# Altium PCB NB3000XN.PcbDoc (part 27 of 71)
Units mil, origin at the board's own origin, x right, y up, seen from the top; angles counter-clockwise.
Board outline 9527.56 x 6929.77 mil, 6 copper layers (Top Layer, GND+SHIELD, MidLayer1, MidLayer2, P2 - 3V3+5V0, Bottom Layer), stack 62.375 mil thick; 832 components, 1027 nets, 4655 pads, 4981 vias.
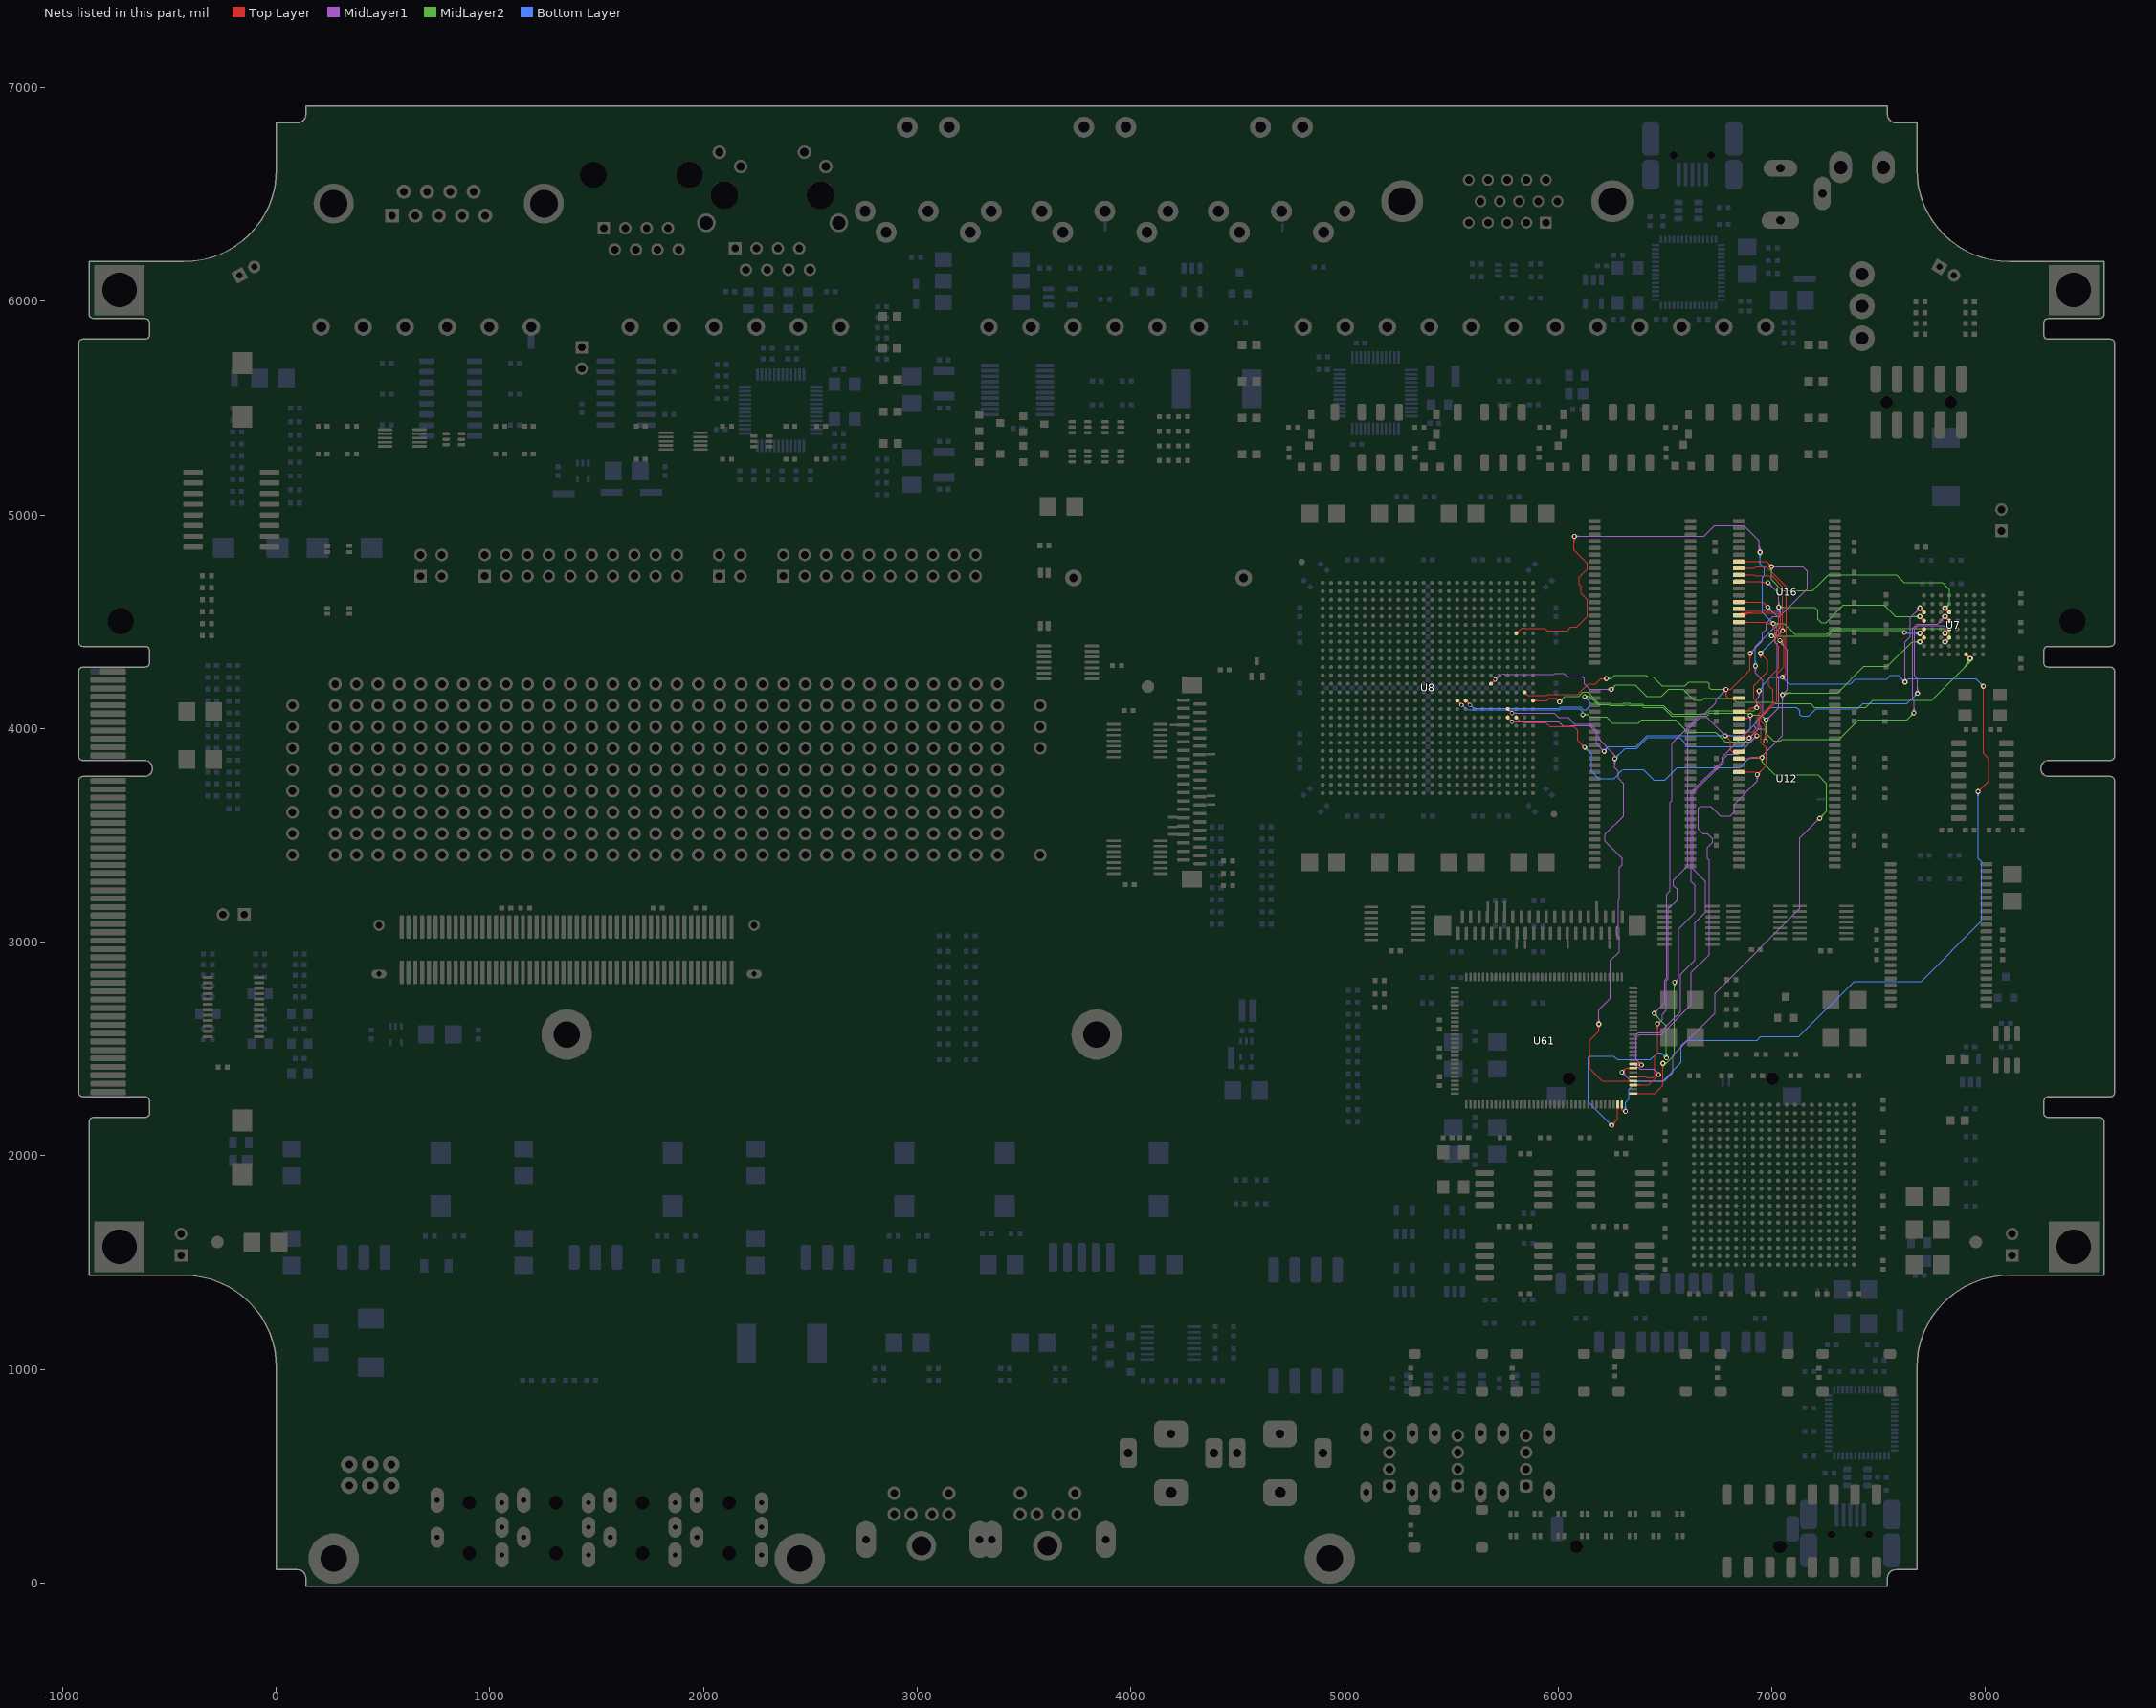
[diagram p31: the nets of this part, all layers, seen from the top]

## Via types
v1: diameter 23, hole 11.81, Top Layer to Bottom Layer, 3672 vias
v2: diameter 26, hole 11.81, Top Layer to Bottom Layer, 461 vias
v3: diameter 19, hole 11.81, Top Layer to Bottom Layer, tented both sides, 396 vias
v4: diameter 23.62, hole 11.81, Top Layer to Bottom Layer, 288 vias
v5: diameter 20, hole 11.81, Top Layer to Bottom Layer, 91 vias
v6: diameter 23, hole 11.81, Top Layer to Bottom Layer, tented both sides, 50 vias
v7: diameter 31, hole 11.81, Top Layer to Bottom Layer, 15 vias
v8: diameter 27.56, hole 11.81, Top Layer to Bottom Layer, tented both sides, 4 vias
v9: diameter 29, hole 11.81, Top Layer to Bottom Layer, 3 vias
v10: diameter 21, hole 11.81, Top Layer to Bottom Layer, 1 vias

## Nets (pads, with @x,y where several pads share a name; then routed paths per layer and width w, separated by ;. In a path a pad name is that pad's centre, name@x,y a point inside that pad or via, vN(x,y) a via of type N, cw(c..) or ccw(c..) an arc to the next point about the centre after c; other vN are vias at no path point) (continued)
DB_MEM.BUS_A24: U7.C8 U8.N21 | length 2990.7
  Top Layer w4: U8.N21@5685.28,4209.69 v3(5704.96,4229.37) ; U8.N21@5685.28,4217.03 ccw(c5685.28,4234.75) 5697.81,4222.22 ccw(c5710.34,4209.69) U8.N21@5692.62,4209.69 ; U8.N21@5685.28,4217.19 ccw(c5685.28,4235.29) 5698.08,4222.49 ccw(c5710.88,4209.69) U8.N21@5692.78,4209.69 ; 5692.16,4216.57 cw(c5704.96,4203.76) 5704.96,4221.87 ccw(c5704.96,4203.76) 5692.16,4216.57 ; 5692.16,4216.57 ccw(c5679.35,4229.37) 5697.46,4229.37 cw(c5679.35,4229.37) 5692.16,4216.57
  Top Layer w8: U7.C8@7909.06,4341.2 cw(c7909.06,4326.72) 7919.3,4336.96 cw(c7929.54,4347.2) U7.C8@7915.06,4347.2 ; U7.C8@7909.06,4347.2 v2(7928.74,4327.52) ; v2@7919.74,4327.52 ccw(c7898.01,4327.52) 7913.38,4342.88 ccw(c7928.74,4358.25) v2@7928.74,4336.52
  MidLayer1 w4: v3@5705.61,4236.84 ccw(c5707.19,4254.88) 5718.83,4241.01 ; v3@5712.43,4228.72 cw(c5730.47,4227.14) 5718.83,4241.01 ; 5781.77,4253.23 5767.84,4253.23 ; v1@6241.81,4176.66 ccw(c6225.59,4160.44) 6225.59,4183.37 ccw(c6225.59,4206.31) v1@6241.81,4190.09 ; v1@6244.64,4179.49 ccw(c6235.25,4170.1) 6235.25,4183.37 ccw(c6235.25,4196.65) v1@6244.64,4187.26 ; v1(6248.52,4183.37) 6148.52,4183.37 6123.52,4208.37 6123.52,4233.37 6115.19,4241.71 6044.19,4241.71 6027.52,4258.37 5985,4258.37 5979.86,4253.23 5920,4253.23 5910,4253.23 5861.38,4253.23 5841.96,4253.23 5767.84,4253.23 ; 5718.83,4241.01 cw(c5748.34,4211.5) 5748.34,4253.23 5767.84,4253.23
  MidLayer2 w4: v1(6248.52,4183.37) 6270.19,4205.04 6360.19,4205.04 6415.19,4150.04 6483.88,4150.04 6517.21,4183.37 6584.84,4183.37 6634.84,4133.37 6656.86,4133.37 6673.52,4133.37 6681.86,4141.71 6815.19,4141.71 6831.86,4125.04 7006.86,4125.04 7015.19,4116.71 7181.86,4116.71 7198.52,4100.04 7440.19,4100.04 7473.52,4133.37 7748.19,4133.37 7930.19,4315.37 7928.86,4316.71 7928.74,4316.71 v2(7928.74,4327.52) ; v1@6248.52,4188.87 ccw(c6248.52,4202.15) 6257.91,4192.76 ccw(c6267.3,4183.37) v1@6254.02,4183.37 ; v1@6248.52,4192.87 ccw(c6248.52,4215.81) 6264.74,4199.59 ccw(c6280.96,4183.37) v1@6258.02,4183.37 ; 7900.35,4285.53 ccw(c7858.36,4327.52) v2@7917.74,4327.52 ; 7907.18,4292.36 ccw(c7872.02,4327.52) v2@7921.74,4327.52 ; 7914.01,4299.19 ccw(c7885.68,4327.52) v2@7925.74,4327.52 ; 7920.83,4306.02 ccw(c7899.33,4327.52) v2@7929.74,4327.52 ; 7927.66,4312.85 ccw(c7912.99,4327.52) v2@7933.74,4327.52
DB_MEM.BUS_D0: U7.E3 U8.P25 U12.2 U16.7 U61.37 | length 7296.9
  Top Layer w4: U8.P25@5842.76,4162.97 cw(c5842.76,4145.25) 5855.29,4157.78 ; U8.P25@5850.1,4170.31 ccw(c5867.83,4170.31) 5855.29,4157.78 ; v1@6218.81,4226.66 ccw(c6202.59,4210.44) 6202.59,4233.37 ccw(c6202.59,4256.31) v1@6218.81,4240.09 ; v1@6221.64,4229.49 ccw(c6212.25,4220.1) 6212.25,4233.37 ccw(c6212.25,4246.65) v1@6221.64,4237.26 ; v1(6225.52,4233.37) 6198.52,4233.37 6173.52,4208.37 6141.52,4208.37 6092.52,4159.37 5953.04,4159.37 5948.47,4154.81 5920,4154.81 5910,4154.81 5862.47,4154.81 cw(c5862.47,4164.96) 5855.29,4157.78 ; v1(6250.52,2142.37) 6278.66,2170.51 U61.37@6278.66,2240 ; v1@6250.52,2147.87 ccw(c6250.52,2161.15) 6259.91,2151.76 ccw(c6269.3,2142.37) v1@6256.02,2142.37 ; v1@6250.52,2151.87 ccw(c6250.52,2174.81) 6266.74,2158.59 ccw(c6282.96,2142.37) v1@6260.02,2142.37 ; U61.37@6275.83,2223.98 cw(c6269,2217.15) 6278.66,2217.15 cw(c6288.32,2217.15) U61.37@6281.49,2223.98 ; v1@6778.47,4176.66 cw(c6762.26,4160.44) 6785.19,4160.44 cw(c6808.13,4160.44) v1@6791.91,4176.66 ; v1@6781.3,4179.49 cw(c6771.91,4170.1) 6785.19,4170.1 cw(c6798.47,4170.1) v1@6789.08,4179.49 ; v1@6789.11,4179.52 cw(c6798.31,4170.47) 6798.31,4183.37 cw(c6798.31,4196.28) v1@6789.11,4187.23 ; v1@6791.96,4176.71 cw(c6807.86,4161.09) 6807.86,4183.37 ; v1@6791.96,4190.04 ccw(c6807.86,4205.66) 6807.86,4183.37 ; U12.2@6822.37,4137.3 ccw(c6808.72,4123.64) 6808.72,4142.95 ccw(c6808.72,4162.27) U12.2@6822.37,4148.61 ; U12.2@6825.61,4142.95 U12.2@6845.59,4142.95 6796.05,4142.95 6785.19,4153.81 v1(6785.19,4183.37) 6807.86,4183.37 ; U16.7@6845.59,4781.73 6975.17,4781.73 v1(6998.52,4758.37) ; U16.7@6868.81,4776.08 cw(c6882.46,4762.42) 6882.46,4781.73 cw(c6882.46,4801.05) U16.7@6868.81,4787.39 ; v1@6891.81,4345.66 cw(c6875.59,4329.44) 6898.52,4329.44 cw(c6921.46,4329.44) v1@6905.24,4345.66 ; v1@6894.64,4348.49 cw(c6885.25,4339.1) 6898.52,4339.1 cw(c6911.8,4339.1) v1@6902.41,4348.49 ; v1(6898.52,4352.37) 6898.52,4274.04 6807.86,4183.37 ; v1@6989.02,4758.37 ccw(c6966.09,4758.37) 6982.31,4774.59 ccw(c6998.52,4790.81) v1@6998.52,4767.87 ; v1@6993.02,4758.37 ccw(c6979.75,4758.37) 6989.14,4767.76 ccw(c6998.52,4777.15) v1@6998.52,4763.87
  Top Layer w8: v2@7810.63,4554.74 cw(c7810.63,4533.01) 7825.99,4548.38 cw(c7841.36,4563.74) v2@7819.63,4563.74 ; v2(7810.63,4563.74) U7.E3@7830.32,4544.06 ; U7.E3@7824.32,4544.06 ccw(c7809.83,4544.06) 7820.07,4554.3 ccw(c7830.32,4564.54) U7.E3@7830.32,4550.06
  MidLayer1 w4: v1(6448.52,2666.71) 6498.52,2716.71 6498.52,2822.67 6507.19,2831.34 6507.19,3224.41 6523.52,3240.75 6523.52,3654.79 ; v1@6448.52,2672.21 ccw(c6448.52,2685.49) 6457.91,2676.1 ccw(c6467.3,2666.71) v1@6454.02,2666.71 ; v1@6448.52,2676.21 ccw(c6448.52,2699.14) 6464.74,2682.93 ccw(c6480.96,2666.71) v1@6458.02,2666.71 ; 6530,3661.26 6523.52,3654.79 ; v1@6775.69,4183.37 cw(c6752.76,4183.37) 6768.97,4167.16 cw(c6785.19,4150.94) v1@6785.19,4173.87 ; v1@6779.69,4183.37 cw(c6766.41,4183.37) 6775.8,4173.99 cw(c6785.19,4164.6) v1@6785.19,4177.87 ; v1(6785.19,4183.37) 6737.87,4136.06 6737.87,4122.72 6685.15,4070 6671.5,4070 6531.86,3930.36 6531.86,3663.12 6523.52,3654.79 ; v1(6898.52,4352.37) 6956.86,4410.71 6956.86,4448.37 6973.52,4465.04 6973.52,4492.71 7005.86,4525.04 7037.19,4525.04 7166.52,4654.37 7166.52,4735.37 7143.52,4758.37 v1(6998.52,4758.37) ; v1@6898.52,4357.87 ccw(c6898.52,4371.15) 6907.91,4361.76 ccw(c6917.3,4352.37) v1@6904.02,4352.37 ; v1@6898.52,4361.87 ccw(c6898.52,4384.81) 6914.74,4368.59 ccw(c6930.96,4352.37) v1@6908.02,4352.37 ; v1@7002.41,4754.49 cw(c7011.8,4745.1) 7011.8,4758.37 cw(c7011.8,4771.65) v1@7002.41,4762.26 ; v1@7005.24,4751.66 cw(c7021.46,4735.44) 7021.46,4758.37 cw(c7021.46,4781.31) v1@7005.24,4765.09
  MidLayer2 w4: v1(6225.52,4233.37) 6248.52,4233.37 6265.19,4250.04 6411.6,4250.04 6419.94,4241.71 6444.19,4241.71 6486.52,4199.37 6593.5,4199.37 6612.17,4218.04 6698.52,4218.04 6706.86,4209.71 6706.86,4191.71 6715.19,4183.37 v1(6785.19,4183.37) ; v1@6229.41,4229.49 cw(c6238.8,4220.1) 6238.8,4233.37 cw(c6238.8,4246.65) v1@6229.41,4237.26 ; v1@6232.24,4226.66 cw(c6248.46,4210.44) 6248.46,4233.37 cw(c6248.46,4256.31) v1@6232.24,4240.09 ; v1@6448.52,2657.21 cw(c6448.52,2634.27) 6464.74,2650.49 cw(c6480.96,2666.71) v1@6458.02,2666.71 ; v1@6448.52,2661.21 cw(c6448.52,2647.93) 6457.91,2657.32 cw(c6467.3,2666.71) v1@6454.02,2666.71 ; v1(6448.52,2666.71) 6506.86,2608.37 v1(6506.86,2458.37) ; v1@6500.14,2465.09 ccw(c6483.92,2481.31) 6506.86,2481.31 ccw(c6529.79,2481.31) v1@6513.57,2465.09 ; v1@6502.97,2462.26 ccw(c6493.58,2471.65) 6506.86,2471.65 ccw(c6520.14,2471.65) v1@6510.75,2462.26 ; v1@6778.47,4176.66 ccw(c6762.26,4160.44) 6762.26,4183.37 ccw(c6762.26,4206.31) v1@6778.47,4190.09 ; v1@6781.3,4179.49 ccw(c6771.91,4170.1) 6771.91,4183.37 ccw(c6771.91,4196.65) v1@6781.3,4187.26 ; v1@6991.81,4751.66 cw(c6975.59,4735.44) 6998.52,4735.44 cw(c7021.46,4735.44) v1@7005.24,4751.66 ; v1@6994.64,4754.49 cw(c6985.25,4745.1) 6998.52,4745.1 cw(c7011.8,4745.1) v1@7002.41,4754.49 ; v1(6998.52,4758.37) 6998.52,4696.48 7048.96,4646.04 7191.04,4646.04 7265,4720 7582.54,4720 7619.17,4683.37 7798.52,4683.37 7831.86,4650.04 7831.86,4584.97 7818.27,4571.37 7810.63,4571.37 v2(7810.63,4563.74) ; v2@7810.63,4570.74 ccw(c7810.63,4587.64) 7822.58,4575.69 ccw(c7834.53,4563.74) v2@7817.63,4563.74 ; v2@7810.63,4574.74 ccw(c7810.63,4601.3) 7829.41,4582.52 ccw(c7848.19,4563.74) v2@7821.63,4563.74
  Bottom Layer w4: v1@6241.02,2142.37 ccw(c6218.09,2142.37) 6234.31,2158.59 ccw(c6250.52,2174.81) v1@6250.52,2151.87 ; v1@6245.02,2142.37 ccw(c6231.75,2142.37) 6241.14,2151.76 ccw(c6250.52,2161.15) v1@6250.52,2147.87 ; v1(6250.52,2142.37) 6140.19,2252.71 6140.19,2395 6140.19,2400.04 6140.19,2460.19 6146.71,2466.71 6206.86,2466.71 6260.54,2466.71 6277.21,2450.04 6431.86,2450.04 6465.19,2483.37 6481.86,2483.37 v1(6506.86,2458.37) ; v1@6497.36,2458.37 ccw(c6474.42,2458.37) 6490.64,2474.59 ccw(c6506.86,2490.81) v1@6506.86,2467.87 ; v1@6501.36,2458.37 ccw(c6488.08,2458.37) 6497.47,2467.76 ccw(c6506.86,2477.15) v1@6506.86,2463.87
DB_MEM.BUS_D1: U7.H3 U8.R26 U12.4 U16.8 U61.38 | length 7924
  Top Layer w4: U8.R26@5882.13,4130.94 5910,4130.94 5920,4130.94 5947.24,4130.94 5958,4141.71 5990.19,4141.71 v1(6006.86,4125.04) ; U8.R26@5887.32,4125.75 cw(c5899.85,4113.22) 5899.85,4130.94 cw(c5899.85,4148.67) U8.R26@5887.32,4136.14 ; U8.R26@5887.43,4125.64 cw(c5900.23,4112.84) 5900.23,4130.94 cw(c5900.23,4149.05) U8.R26@5887.43,4136.25 ; v1@5997.36,4125.04 ccw(c5974.42,4125.04) 5990.64,4141.26 ccw(c6006.86,4157.48) v1@6006.86,4134.54 ; v1@6001.36,4125.04 ccw(c5988.08,4125.04) 5997.47,4134.43 ccw(c6006.86,4143.82) v1@6006.86,4130.54 ; U61.38@6295.52,2223.98 cw(c6288.69,2217.15) 6298.35,2217.15 cw(c6308,2217.15) U61.38@6301.17,2223.98 ; U61.38@6298.34,2240 6298.35,2216.37 6306.35,2208.37 v1(6315.19,2208.37) ; U12.4@6845.59,4079.96 6882.6,4079.96 6900.02,4097.37 v1(6929.52,4097.37) ; U16.8@6845.59,4750.24 6918.39,4750.24 6926.52,4758.37 6973.52,4758.37 7068.86,4663.04 7068.86,4433.37 7065.19,4429.71 7065.19,4257.37 v1(7048.52,4240.71) ; U12.4@6868.81,4074.3 cw(c6882.46,4060.65) 6882.46,4079.96 cw(c6882.46,4099.27) U12.4@6868.81,4085.62 ; U16.8@6868.81,4744.58 cw(c6882.46,4730.92) 6882.46,4750.24 cw(c6882.46,4769.55) U16.8@6868.81,4755.89 ; v1@6922.81,4090.66 ccw(c6906.59,4074.44) 6906.59,4097.37 ccw(c6906.59,4120.31) v1@6922.81,4104.09 ; v1@6925.64,4093.49 ccw(c6916.25,4084.1) 6916.25,4097.37 ccw(c6916.25,4110.65) v1@6925.64,4101.26 ; v1@7048.52,4246.21 ccw(c7048.52,4259.49) 7057.91,4250.1 ccw(c7067.3,4240.71) v1@7054.02,4240.71 ; v1@7048.52,4250.21 ccw(c7048.52,4273.14) 7064.74,4256.93 ccw(c7080.96,4240.71) v1@7058.02,4240.71 ; v1(7965.19,3705.37) 8015.19,3755.37 8015.19,3858.37 7990.19,3883.37 v1(7990.19,4198.04) ; v1@7965.19,3710.87 ccw(c7965.19,3724.15) 7974.58,3714.76 ccw(c7983.97,3705.37) v1@7970.69,3705.37 ; v1@7965.19,3714.87 ccw(c7965.19,3737.81) 7981.41,3721.59 ccw(c7997.63,3705.37) v1@7974.69,3705.37
  Top Layer w8: v2@7692.52,4554.74 cw(c7692.52,4533.01) 7707.88,4548.38 cw(c7723.25,4563.74) v2@7701.52,4563.74 ; v2(7692.52,4563.74) U7.H3@7712.2,4544.06 ; U7.H3@7706.2,4544.06 ccw(c7691.72,4544.06) 7701.96,4554.3 ccw(c7712.2,4564.54) U7.H3@7712.2,4550.06
  MidLayer1 w4: v1@6922.81,4104.09 ccw(c6906.59,4120.31) 6929.52,4120.31 ccw(c6952.46,4120.31) v1@6936.24,4104.09 ; v1@6925.64,4101.26 ccw(c6916.25,4110.65) 6929.52,4110.65 ccw(c6942.8,4110.65) v1@6933.41,4101.26 ; v1(6929.52,4097.37) 6929.52,4139.52 6940,4150 ; v1@6933.47,4169.99 cw(c6917.26,4153.77) 6940.19,4153.77 cw(c6963.13,4153.77) v1@6946.91,4169.99 ; v1@6936.3,4172.82 cw(c6926.91,4163.43) 6940.19,4163.43 cw(c6953.47,4163.43) v1@6944.08,4172.82 ; 6940.19,4150 v1(6940.19,4176.71) ; v1@7616.81,4224.43 ccw(c7600.59,4240.64) 7623.52,4240.64 ccw(c7646.46,4240.64) v1@7630.24,4224.43 ; v1@7619.64,4221.6 ccw(c7610.25,4230.99) 7623.52,4230.99 ccw(c7636.8,4230.99) v1@7627.41,4221.6 ; v1(7623.52,4217.71) 7623.52,4405.39 7648.52,4430.39 7648.52,4519.74 v2(7692.52,4563.74) ; v2@7681.52,4563.74 cw(c7654.96,4563.74) 7673.74,4544.96 cw(c7692.52,4526.19) v2@7692.52,4552.74 ; v2@7685.52,4563.74 cw(c7668.62,4563.74) 7680.57,4551.79 cw(c7692.52,4539.84) v2@7692.52,4556.74
  MidLayer2 w4: v1(6006.86,4125.04) 6031.86,4150.04 6095.52,4150.04 6115.48,4170 6138.23,4170 6188.52,4119.71 6241.48,4119.71 6245.82,4115.37 6302.56,4115.37 6306,4118.81 6334,4118.81 6337.44,4115.37 6394.5,4115.37 6401.5,4108.38 6493.16,4108.38 6534.17,4067.37 6692.86,4067.37 6708.86,4083.37 6915.52,4083.37 v1(6929.52,4097.37) ; v1@6006.86,4130.54 ccw(c6006.86,4143.82) 6016.25,4134.43 ccw(c6025.64,4125.04) v1@6012.36,4125.04 ; v1@6006.86,4134.54 ccw(c6006.86,4157.48) 6023.07,4141.26 ccw(c6039.29,4125.04) v1@6016.36,4125.04
  Bottom Layer w4: v1@6308.47,2215.09 ccw(c6292.26,2231.31) 6315.19,2231.31 ccw(c6338.13,2231.31) v1@6321.91,2215.09 ; v1@6311.3,2212.26 ccw(c6301.91,2221.65) 6315.19,2221.65 ccw(c6328.47,2221.65) v1@6319.08,2212.26 ; v1(6315.19,2208.37) 6315.19,2250 6332.19,2267 6332.19,2312.19 6370.04,2350.04 6489.58,2350.04 6576.18,2436.64 6576.18,2516.38 6601.51,2541.71 6930.52,2541.71 6947.19,2558.37 7126.86,2558.37 7385.19,2816.71 7698.52,2816.71 7981.86,3100.04 7981.86,3376.04 7965.19,3392.71 v1(7965.19,3705.37) ; v1(6940.19,4176.71) 6955.75,4192.27 6955.75,4202.62 6993.84,4240.71 v1(7048.52,4240.71) 7080.86,4208.37 7367.54,4208.37 7391.54,4232.37 7537.33,4232.37 7555,4250.04 7591.19,4250.04 v1(7623.52,4217.71) 7639.19,4233.37 7954.86,4233.37 v1(7990.19,4198.04) ; v1@7041.81,4233.99 ccw(c7025.59,4217.77) 7025.59,4240.71 ccw(c7025.59,4263.64) v1@7041.81,4247.43 ; v1@7044.64,4236.82 ccw(c7035.25,4227.43) 7035.25,4240.71 ccw(c7035.25,4253.99) v1@7044.64,4244.6 ; v1@7048.52,4231.21 cw(c7048.52,4208.27) 7064.74,4224.49 cw(c7080.96,4240.71) v1@7058.02,4240.71 ; v1@7048.52,4235.21 cw(c7048.52,4221.93) 7057.91,4231.32 cw(c7067.3,4240.71) v1@7054.02,4240.71 ; v1@7614.02,4217.71 ccw(c7591.09,4217.71) 7607.31,4233.93 ccw(c7623.52,4250.14) v1@7623.52,4227.21 ; v1@7618.02,4217.71 ccw(c7604.75,4217.71) 7614.13,4227.1 ccw(c7623.52,4236.49) v1@7623.52,4223.21 ; v1@7958.47,3698.66 cw(c7942.26,3682.44) 7965.19,3682.44 cw(c7988.13,3682.44) v1@7971.91,3698.66 ; v1@7961.3,3701.49 cw(c7951.91,3692.1) 7965.19,3692.1 cw(c7978.47,3692.1) v1@7969.08,3701.49 ; v1@7980.69,4198.04 ccw(c7957.76,4198.04) 7973.97,4214.26 ccw(c7990.19,4230.48) v1@7990.19,4207.54 ; v1@7984.69,4198.04 ccw(c7971.41,4198.04) 7980.8,4207.43 ccw(c7990.19,4216.82) v1@7990.19,4203.54
DB_MEM.BUS_D2: U7.E4 U8.R18 U12.5 U16.9 U61.39 | length 7174.9
  Top Layer w4: U8.R18@5567.17,4123.44 cw(c5567.17,4105.34) 5579.97,4118.14 cw(c5592.77,4130.94) U8.R18@5574.67,4130.94 ; U8.R18@5567.17,4123.6 cw(c5567.17,4105.88) 5579.7,4118.41 cw(c5592.23,4130.94) U8.R18@5574.51,4130.94 ; U8.R18@5567.17,4130.94 v3(5586.85,4111.26) ; U61.39@6351.93,2291.98 6451.19,2291.98 6490.19,2330.98 v1(6490.19,2433.37) ; U61.39@6367.95,2289.15 cw(c6374.78,2282.32) 6374.78,2291.98 cw(c6374.78,2301.63) U61.39@6367.95,2294.8 ; v1@6483.47,2426.66 cw(c6467.26,2410.44) 6490.19,2410.44 cw(c6513.13,2410.44) v1@6496.91,2426.66 ; v1@6486.3,2429.49 cw(c6476.91,2420.1) 6490.19,2420.1 cw(c6503.47,2420.1) v1@6494.08,2429.49 ; U12.5@6845.59,4048.46 6885.28,4048.46 v1(6899.19,4062.37) ; U16.9@6845.59,4718.74 6915.52,4718.74 6919.52,4714.74 7000.49,4714.74 7050.86,4664.37 v1(7050.86,4458.37) ; U12.5@6868.81,4042.81 cw(c6882.46,4029.15) 6882.46,4048.46 cw(c6882.47,4067.78) U12.5@6868.81,4054.12 ; U16.9@6868.81,4713.08 cw(c6882.46,4699.43) 6882.46,4718.74 cw(c6882.46,4738.05) U16.9@6868.81,4724.4 ; v1@7044.14,4465.09 ccw(c7027.92,4481.31) 7050.86,4481.31 ccw(c7073.79,4481.31) v1@7057.57,4465.09 ; v1@7046.97,4462.26 ccw(c7037.58,4471.65) 7050.86,4471.65 ccw(c7064.14,4471.65) v1@7054.75,4462.26 ; 5574.05,4124.06 cw(c5561.24,4111.26) 5579.35,4111.26 ccw(c5561.24,4111.26) 5574.05,4124.06 ; 5574.05,4124.06 ccw(c5586.85,4136.87) 5586.85,4118.76 cw(c5586.85,4136.87) 5574.05,4124.06
  Top Layer w8: v2@7810.63,4515.37 cw(c7810.63,4493.64) 7825.99,4509.01 cw(c7841.36,4524.37) v2@7819.63,4524.37 ; v2(7810.63,4524.37) U7.E4@7830.32,4504.69 ; U7.E4@7824.32,4504.69 ccw(c7809.83,4504.69) 7820.07,4514.93 ccw(c7830.32,4525.17) U7.E4@7830.32,4510.69
  MidLayer1 w4: v1(6544.86,2813.04) 6561.71,2829.89 6564.86,2833.04 6564.86,3063 6640.19,3138.33 6640.19,3266.71 6623.52,3283.37 6623.52,3702.67 6767,3846.15 6767,3867 6899.19,3999.19 v1(6899.19,4062.37) ; v1@6544.86,2818.54 ccw(c6544.86,2831.82) 6554.25,2822.43 ccw(c6563.64,2813.04) v1@6550.36,2813.04 ; v1@6544.86,2822.54 ccw(c6544.86,2845.48) 6561.07,2829.26 ccw(c6577.29,2813.04) v1@6554.36,2813.04 ; v1@6892.47,4055.66 cw(c6876.26,4039.44) 6899.19,4039.44 cw(c6922.13,4039.44) v1@6905.91,4055.66 ; v1@6895.3,4058.49 cw(c6885.91,4049.1) 6899.19,4049.1 cw(c6912.47,4049.1) v1@6903.08,4058.49 ; v1(6973.52,4039.71) 7031.86,4098.04 7031.86,4233.37 7025.19,4240.04 7025.19,4396.04 7015.19,4406.04 7015.19,4422.71 v1(7050.86,4458.37) ; v1@6973.52,4045.21 ccw(c6973.52,4058.49) 6982.91,4049.1 ccw(c6992.3,4039.71) v1@6979.02,4039.71 ; v1@6973.52,4049.21 ccw(c6973.52,4072.14) 6989.74,4055.93 ccw(c7005.96,4039.71) v1@6983.02,4039.71 ; v1@7041.36,4458.37 cw(c7018.42,4458.37) 7034.64,4442.16 cw(c7050.86,4425.94) v1@7050.86,4448.87 ; v1@7045.36,4458.37 cw(c7032.08,4458.37) 7041.47,4448.99 cw(c7050.86,4439.6) v1@7050.86,4452.87 ; v1@7658.47,4080.09 ccw(c7642.26,4096.31) 7665.19,4096.31 ccw(c7688.13,4096.31) v1@7671.91,4080.09 ; v1@7661.3,4077.26 ccw(c7651.91,4086.65) 7665.19,4086.65 ccw(c7678.47,4086.65) v1@7669.08,4077.26 ; v1(7665.19,4073.37) 7665.19,4129.81 7660,4135 7660,4469.85 7679.97,4489.82 7776.08,4489.82 v2(7810.63,4524.37) ; v2@7799.63,4524.37 cw(c7773.07,4524.37) 7791.85,4505.59 cw(c7810.63,4486.82) v2@7810.63,4513.37 ; v2@7803.63,4524.37 cw(c7786.73,4524.37) 7798.68,4512.42 cw(c7810.63,4500.47) v2@7810.63,4517.37
  MidLayer2 w4: v1(6123.52,4150.04) 6146.88,4150.04 6185.21,4111.71 6238.17,4111.71 6242.5,4107.37 6305.87,4107.37 6309.31,4110.81 6330.69,4110.81 6334.13,4107.37 6391.19,4107.37 6398.18,4100.38 6489.85,4100.38 6530.86,4059.37 6697.19,4059.37 6709.86,4072.04 6889.52,4072.04 v1(6899.19,4062.37) 6950.86,4062.37 v1(6973.52,4039.71) 6973.52,3975.04 7006.86,3941.71 7040.19,3941.71 7048.52,3950.04 7314.58,3950.04 7405.92,4041.37 7633.19,4041.37 7641.86,4050.04 v1(7665.19,4073.37) ; v1@6127.41,4146.15 cw(c6136.8,4136.76) 6136.8,4150.04 cw(c6136.8,4163.32) v1@6127.41,4153.93 ; v1@6130.24,4143.32 cw(c6146.46,4127.11) 6146.46,4150.04 cw(c6146.46,4172.98) v1@6130.24,4156.76 ; v1(6490.19,2433.37) 6506.86,2433.37 ; v1@6498.36,2428.53 cw(c6506.86,2423.51) 6506.86,2433.37 ; v1@6498.36,2438.22 ccw(c6506.86,2443.24) 6506.86,2433.37 ; v1@6538.14,2806.32 cw(c6521.92,2790.11) 6544.86,2790.11 cw(c6567.79,2790.11) v1@6551.57,2806.32 ; v1@6540.97,2809.15 cw(c6531.58,2799.76) 6544.86,2799.76 cw(c6558.14,2799.76) v1@6548.75,2809.15 ; v1(6544.86,2813.04) 6544.86,2471.37 6506.86,2433.37 ; v1@6903.08,4058.49 cw(c6912.47,4049.1) 6912.47,4062.37 cw(c6912.47,4075.65) v1@6903.08,4066.26 ; v1@6905.91,4055.66 cw(c6922.13,4039.44) 6922.13,4062.37 cw(c6922.13,4085.31) v1@6905.91,4069.09 ; v1@6964.02,4039.71 ccw(c6941.09,4039.71) 6957.31,4055.93 ccw(c6973.52,4072.14) v1@6973.52,4049.21 ; v1@6966.81,4032.99 cw(c6950.59,4016.77) 6973.52,4016.77 cw(c6996.46,4016.77) v1@6980.24,4032.99 ; v1@6968.02,4039.71 ccw(c6954.75,4039.71) 6964.14,4049.1 ccw(c6973.52,4058.49) v1@6973.52,4045.21 ; v1@6969.64,4035.82 cw(c6960.25,4026.43) 6973.52,4026.43 cw(c6986.8,4026.43) v1@6977.41,4035.82 ; v1@7655.69,4073.37 cw(c7632.76,4073.37) 7648.97,4057.16 cw(c7665.19,4040.94) v1@7665.19,4063.87 ; v1@7659.69,4073.37 cw(c7646.41,4073.37) 7655.8,4063.99 cw(c7665.19,4054.6) v1@7665.19,4067.87
  Bottom Layer w4: v3@5587.5,4103.79 cw(c5589.08,4085.75) 5600.72,4099.62 cw(c5612.36,4113.49) v3@5594.32,4111.91 ; 5600.43,4099.87 ccw(c5610.36,4109.8) 5610.36,4095.75 5703.9,4095.75 5910,4095.75 5920,4095.75 6005.15,4095.75 6010.21,4100.81 6105.09,4100.81 6116.87,4089.02 6131.84,4089.02 6133.58,4090.77 6148.52,4105.71 6148.52,4125.04 v1(6123.52,4150.04) ; v1@6123.52,4140.54 cw(c6123.52,4117.61) 6139.74,4133.82 cw(c6155.96,4150.04) v1@6133.02,4150.04 ; v1@6123.52,4144.54 cw(c6123.52,4131.26) 6132.91,4140.65 cw(c6142.3,4150.04) v1@6129.02,4150.04
DB_MEM.BUS_D3: U7.H4 U8.R17 U12.7 U16.10 U61.41 | length 6741.8
  Top Layer w4: U8.R17@5527.8,4123.44 cw(c5527.8,4105.34) 5540.6,4118.14 cw(c5553.4,4130.94) U8.R17@5535.3,4130.94 ; U8.R17@5527.8,4123.6 cw(c5527.8,4105.88) 5540.33,4118.41 cw(c5552.86,4130.94) U8.R17@5535.14,4130.94 ; U8.R17@5527.8,4130.94 v3(5547.48,4111.26) ; U61.41@6356.86,2333.37 6423.52,2333.37 v1(6470.52,2380.37) ; U61.41@6367.95,2328.52 cw(c6379.68,2316.79) 6379.68,2333.37 ; v1@6461.02,2380.37 cw(c6438.09,2380.37) 6454.31,2364.16 cw(c6470.52,2347.94) v1@6470.52,2370.87 ; v1@6465.02,2380.37 cw(c6451.75,2380.37) 6461.14,2370.99 cw(c6470.52,2361.6) v1@6470.52,2374.87 ; U12.7@6845.59,3985.47 6911.52,3985.47 ; U16.10@6845.59,4687.24 6946.66,4687.24 6950.52,4683.37 v1(6981.86,4683.37) ; U12.7@6868.81,3979.82 cw(c6882.46,3966.16) 6882.46,3985.47 cw(c6882.46,4004.79) U12.7@6868.81,3991.13 ; U16.10@6868.81,4681.59 cw(c6882.46,4667.93) 6882.46,4687.24 cw(c6882.46,4706.56) U16.10@6868.81,4692.9 ; 6913.9,3983.09 cw(c6897.52,3966.71) v1@6920.69,3966.71 ; 6914.14,3982.86 ccw(c6930.19,3998.91) v1@6930.19,3976.21 ; v1@6930.19,3966.8 6911.52,3985.47 ; v1@6947.19,4342.87 cw(c6947.19,4319.94) 6963.41,4336.16 cw(c6979.63,4352.37) v1@6956.69,4352.37 ; v1@6947.19,4346.87 cw(c6947.19,4333.6) 6956.58,4342.99 cw(c6965.97,4352.37) v1@6952.69,4352.37 ; v1(6947.19,4352.37) 6981.86,4317.71 6981.86,4266.71 6915.19,4200.04 6915.19,4140.71 6948.52,4107.37 6948.52,4079.71 6931.86,4063.04 6931.86,4005.8 6911.52,3985.47 ; v1@6975.14,4676.66 ccw(c6958.92,4660.44) 6958.92,4683.37 ccw(c6958.92,4706.31) v1@6975.14,4690.09 ; v1@6977.97,4679.49 ccw(c6968.58,4670.1) 6968.58,4683.37 ccw(c6968.58,4696.65) v1@6977.97,4687.26 ; 5534.68,4124.06 cw(c5521.87,4111.26) 5539.98,4111.26 ccw(c5521.87,4111.26) 5534.68,4124.06 ; 5534.68,4124.06 ccw(c5547.48,4136.87) 5547.48,4118.76 cw(c5547.48,4136.87) 5534.68,4124.06 ; 6920.73,3976.26 cw(c6911.18,3966.71) 6924.69,3966.71 ccw(c6911.18,3966.71) 6920.73,3976.26 ; 6920.97,3976.03 ccw(c6930.19,3985.25) 6930.19,3972.21 cw(c6930.19,3985.25) 6920.97,3976.03
  Top Layer w8: v2@7692.52,4515.37 cw(c7692.52,4493.64) 7707.88,4509.01 cw(c7723.25,4524.37) v2@7701.52,4524.37 ; v2(7692.52,4524.37) U7.H4@7712.2,4504.69 ; U7.H4@7706.2,4504.69 ccw(c7691.72,4504.69) 7701.96,4514.93 ccw(c7712.2,4525.17) U7.H4@7712.2,4510.69
  MidLayer1 w4: 6451.01,2404.56 cw(c6426.82,2380.37) v1@6461.02,2380.37 ; 6457.84,2397.73 cw(c6440.48,2380.37) v1@6465.02,2380.37 ; 6462.27,2393.29 ccw(c6470.52,2401.55) v1@6470.52,2389.87 ; 6464.66,2390.9 cw(c6454.14,2380.37) v1@6469.02,2380.37 ; v1@6470.52,2385.04 6448.52,2407.04 6381.86,2407.04 6356.86,2432.04 6356.86,2557.56 6375,2575.71 6474.19,2575.71 6573.52,2675.04 6573.52,2850.04 6640.19,2916.71 6640.19,3091.71 6690.19,3141.71 6690.19,3283.37 6631.86,3341.71 6631.86,3699.69 6775,3842.83 6775,3860 6795,3880 6843.48,3880 v1(6930.19,3966.71) ; v1@6920.69,3966.71 cw(c6897.76,3966.71) 6913.97,3950.49 cw(c6930.19,3934.27) v1@6930.19,3957.21 ; v1@6924.69,3966.71 cw(c6911.41,3966.71) 6920.8,3957.32 cw(c6930.19,3947.93) v1@6930.19,3961.21 ; v1@6941.14,4345.05 cw(c6930.5,4332.19) 6947.19,4332.19 cw(c6963.88,4332.19) v1@6953.24,4345.05 ; v1@6943.69,4348.14 cw(c6937.53,4340.69) 6947.19,4340.69 cw(c6956.85,4340.69) v1@6950.7,4348.14 ; v1@6981.86,4673.87 cw(c6981.86,4650.94) 6998.07,4667.16 cw(c7014.29,4683.37) v1@6991.36,4683.37 ; v1@6981.86,4677.87 cw(c6981.86,4664.6) 6991.25,4673.99 cw(c7000.64,4683.37) v1@6987.36,4683.37 ; v1(6981.86,4683.37) 7032.52,4632.71 v1(7032.52,4568.37) ; v1@7025.81,4575.09 ccw(c7009.59,4591.31) 7032.52,4591.31 ccw(c7055.46,4591.31) v1@7039.24,4575.09 ; v1@7028.64,4572.26 ccw(c7019.25,4581.65) 7032.52,4581.65 ccw(c7045.8,4581.65) v1@7036.41,4572.26
  MidLayer2 w4: v1(6115,4065) 6138.37,4065 6148.37,4055 6225.23,4055 6253.85,4026.37 6375.88,4026.37 6390.88,4041.37 6510,4041.37 6518.63,4041.37 6548.63,4041.37 6565,4025 6606.96,3983.04 6736.96,3983.04 6782,3938 6901.48,3938 v1(6930.19,3966.71) ; v1@6118.89,4061.11 cw(c6128.28,4051.72) 6128.28,4065 cw(c6128.28,4078.28) v1@6118.89,4068.89 ; v1@6121.72,4058.28 cw(c6137.93,4042.06) 6137.93,4065 cw(c6137.93,4087.93) v1@6121.72,4071.72 ; v1@6920.69,3966.71 cw(c6897.76,3966.71) 6913.97,3950.49 cw(c6930.19,3934.27) v1@6930.19,3957.21 ; v1@6924.69,3966.71 cw(c6911.41,3966.71) 6920.8,3957.32 cw(c6930.19,3947.93) v1@6930.19,3961.21 ; v1(7032.52,4568.37) 7199.86,4568.37 7215.19,4553.04 7215.19,4512.04 7231.86,4495.37 7253.19,4495.37 7335.52,4577.71 7524.61,4577.71 7577.94,4524.37 v2(7692.52,4524.37) ; v1@7036.41,4564.49 cw(c7045.8,4555.1) 7045.8,4568.37 cw(c7045.8,4581.65) v1@7036.41,4572.26 ; v1@7039.24,4561.66 cw(c7055.46,4545.44) 7055.46,4568.37 cw(c7055.46,4591.31) v1@7039.24,4575.09 ; v2@7684.74,4516.59 ccw(c7665.96,4497.82) 7665.96,4524.37 ccw(c7665.96,4550.93) v2@7684.74,4532.15 ; v2@7687.57,4519.42 ccw(c7675.62,4507.47) 7675.62,4524.37 ccw(c7675.62,4541.27) v2@7687.57,4529.32
  Bottom Layer w4: v3@5548.13,4103.79 cw(c5549.71,4085.75) 5561.35,4099.62 ; v3@5554.95,4111.91 ccw(c5572.99,4113.49) 5561.35,4099.62 ; v1(6115,4065) 6115,4079.59 6101.77,4092.81 6013.53,4092.81 6008.11,4087.4 5924.74,4087.4 5920,4087.4 5910,4087.4 5703.9,4087.4 5684.48,4087.4 5610.36,4087.4 5590.86,4087.4 cw(c5590.86,4129.13) 5561.35,4099.62 ; v1(6947.19,4352.37) 7016.19,4421.37 7016.19,4451.04 7040.19,4475.04 7040.19,4560.71 v1(7032.52,4568.37) ; v1@6947.19,4357.87 ccw(c6947.19,4371.15) 6956.58,4361.76 ccw(c6965.97,4352.37) v1@6952.69,4352.37 ; v1@6947.19,4361.87 ccw(c6947.19,4384.81) 6963.41,4368.59 ccw(c6979.63,4352.37) v1@6956.69,4352.37 ; v1@7025.81,4561.66 cw(c6991.08,4526.93) 7040.19,4526.93 ; v1@7028.64,4564.49 cw(c7000.74,4536.59) 7040.19,4536.59 ; v1@7031.46,4567.31 cw(c7010.4,4546.25) 7040.19,4546.25 ; v1@7034.29,4570.14 cw(c7020.05,4555.9) 7040.19,4555.9
DB_MEM.BUS_D4: U7.H5 U8.T23 U12.8 U16.13 U61.42 | length 6009.3
  Top Layer w4: U8.T23@5764.02,4084.07 cw(c5764.02,4065.97) 5776.82,4078.77 cw(c5789.62,4091.57) U8.T23@5771.52,4091.57 ; U8.T23@5764.02,4084.23 cw(c5764.02,4066.51) 5776.55,4079.04 cw(c5789.08,4091.57) U8.T23@5771.36,4091.57 ; U8.T23@5764.02,4091.57 v3(5783.7,4071.89) ; v1@6183.47,2609.99 cw(c6167.26,2593.77) 6190.19,2593.77 cw(c6213.13,2593.77) v1@6196.91,2609.99 ; v1@6186.3,2612.82 cw(c6176.91,2603.43) 6190.19,2603.43 cw(c6203.47,2603.43) v1@6194.08,2612.82 ; v1(6190.19,2616.71) 6190.19,2583.37 6148.52,2541.71 6148.52,2408.37 6205.87,2351.03 U61.42@6351.49,2351.03 ; U61.42@6335.91,2348.2 ccw(c6329.08,2341.37) 6329.08,2351.03 ccw(c6329.08,2360.69) U61.42@6335.91,2353.86 ; U12.8@6845.59,3953.98 6856.86,3953.98 6856.86,3958.37 v1@6891.52,3958.37 ; U16.13@6845.59,4592.76 6957.48,4592.76 v1(6981.86,4568.37) ; U12.8@6863.15,3953.98 cw(c6873.22,3944.66) 6873.22,3958.37 ; U12.8@6864.82,3958.37 cw(c6864.82,3926.33) v1@6887.47,3948.99 ; U12.8@6866.08,3951.26 cw(c6882.37,3936.18) 6882.37,3958.37 ; U16.13@6868.81,4587.1 cw(c6882.46,4573.44) 6882.46,4592.76 cw(c6882.46,4612.07) U16.13@6868.81,4598.41 ; U12.8@6869.02,3948.54 cw(c6891.52,3927.71) v1@6891.52,3958.37 ; 6874.47,3958.37 cw(c6874.47,3935.99) v1@6890.3,3951.82 ; 6877.69,3958.37 ccw(c6877.69,3972.2) v1@6887.47,3962.43 ; v1(6894.19,3955.71) v1@6891.52,3958.37 ; v1@6972.36,4568.37 ccw(c6949.42,4568.37) 6965.64,4584.59 ccw(c6981.86,4600.81) v1@6981.86,4577.87 ; v1@6976.36,4568.37 ccw(c6963.08,4568.37) 6972.47,4577.76 ccw(c6981.86,4587.15) v1@6981.86,4573.87 ; 5770.9,4084.69 cw(c5758.09,4071.89) 5776.2,4071.89 ccw(c5758.09,4071.89) 5770.9,4084.69 ; 5770.9,4084.69 ccw(c5783.7,4097.5) 5783.7,4079.39 cw(c5783.7,4097.5) 5770.9,4084.69
  Top Layer w8: v2(7692.52,4445.63) U7.H5@7712.2,4465.32 ; v2@7692.52,4454.63 ccw(c7692.52,4476.36) 7707.88,4460.99 ccw(c7723.25,4445.63) v2@7701.52,4445.63 ; U7.H5@7706.2,4465.32 cw(c7691.72,4465.32) 7701.96,4455.07 cw(c7712.2,4444.83) U7.H5@7712.2,4459.32
  MidLayer1 w4: v3(5783.7,4071.89) 5861.38,4071.89 5910,4071.89 5920,4071.89 5924.74,4071.89 5981.86,4071.89 5990.19,4063.56 6001.25,4052.5 6046.42,4052.5 6077.04,4021.87 6149.44,4021.87 6187.62,3983.7 6187.62,3953.28 6265.19,3875.71 ; v3@5788.89,4066.7 cw(c5801.43,4054.16) 5801.43,4071.89 cw(c5801.43,4089.62) v3@5788.89,4077.08 ; v3@5789,4066.59 cw(c5801.81,4053.78) 5801.81,4071.89 cw(c5801.81,4090) v3@5789,4077.19 ; v1@6183.47,2623.43 ccw(c6167.26,2639.64) 6190.19,2639.64 ccw(c6213.13,2639.64) v1@6196.91,2623.43 ; v1@6186.3,2620.6 ccw(c6176.91,2629.99) 6190.19,2629.99 ccw(c6203.47,2629.99) v1@6194.08,2620.6 ; v1(6190.19,2616.71) 6190.19,2683.37 6244.86,2738.04 6244.86,2914.02 6285.86,2955.02 6285.86,3022.04 6273.52,3034.37 6273.52,3069.69 6281.19,3077.35 6281.19,3195.02 6285,3198.83 6287.19,3201.02 6287.19,3349.71 6299.52,3362.04 6299.52,3391.71 6220,3471.23 6220,3504.85 6306.43,3591.28 6306.86,3591.71 6306.86,3742.02 6281.86,3767.02 6281.86,3800.04 6265.19,3816.71 v1(6265.19,3859.04) 6265.19,3875.71 ; v1@6258.47,3852.32 cw(c6242.26,3836.11) 6265.19,3836.11 cw(c6288.13,3836.11) v1@6271.91,3852.32 ; v1@6260.35,3867.22 ccw(c6255.32,3875.71) 6265.19,3875.71 ; v1@6261.3,3855.15 cw(c6251.91,3845.76) 6265.19,3845.76 cw(c6278.47,3845.76) v1@6269.08,3855.15 ; v1@6270.03,3867.22 cw(c6275.06,3875.71) 6265.19,3875.71 ; v1(6894.19,3955.71) 6940.19,4001.71 6940.19,4052.35 6958.86,4071.02 6958.86,4224.37 6923.52,4259.71 v1(6923.52,4293.04) ; v1@6894.19,3961.21 ccw(c6894.19,3974.49) 6903.58,3965.1 ccw(c6912.97,3955.71) v1@6899.69,3955.71 ; v1@6894.19,3965.21 ccw(c6894.19,3988.14) 6910.41,3971.93 ccw(c6926.63,3955.71) v1@6903.69,3955.71 ; v1@6916.81,4286.32 cw(c6900.59,4270.11) 6923.52,4270.11 cw(c6946.46,4270.11) v1@6930.24,4286.32 ; v1@6919.64,4289.15 cw(c6910.25,4279.76) 6923.52,4279.76 cw(c6936.8,4279.76) v1@6927.41,4289.15
  MidLayer2 w4: v1(6998.52,4433.37) 7261.47,4433.37 7287.8,4459.71 7333.19,4459.71 7611.19,4459.71 v1(7620.86,4450.04) ; v1@7002.41,4429.49 cw(c7011.8,4420.1) 7011.8,4433.37 cw(c7011.8,4446.65) v1@7002.41,4437.26 ; v1@7005.24,4426.66 cw(c7021.46,4410.44) 7021.46,4433.37 cw(c7021.46,4456.31) v1@7005.24,4440.09
  Bottom Layer w4: v1(6265.19,3859.04) 6313.52,3907.37 6368.17,3907.37 6419.5,3958.71 6567.84,3958.71 6609.84,3916.71 6855.19,3916.71 v1(6894.19,3955.71) ; v1@6265.19,3864.54 ccw(c6265.19,3877.82) 6274.58,3868.43 ccw(c6283.97,3859.04) v1@6270.69,3859.04 ; v1@6265.19,3868.54 ccw(c6265.19,3891.48) 6281.41,3875.26 ccw(c6297.63,3859.04) v1@6274.69,3859.04 ; v1@6884.69,3955.71 cw(c6861.76,3955.71) 6877.97,3939.49 cw(c6894.19,3923.27) v1@6894.19,3946.21 ; v1@6888.69,3955.71 cw(c6875.41,3955.71) 6884.8,3946.32 cw(c6894.19,3936.93) v1@6894.19,3950.21 ; v1@6916.81,4299.76 ccw(c6900.59,4315.98) 6923.52,4315.98 ccw(c6946.46,4315.98) v1@6930.24,4299.76 ; v1@6919.64,4296.93 ccw(c6910.25,4306.32) 6923.52,4306.32 ccw(c6936.8,4306.32) v1@6927.41,4296.93 ; v1(6923.52,4293.04) 6923.52,4383.37 6986.02,4445.87 ; v1@6981.86,4558.87 cw(c6981.86,4535.94) 6998.07,4552.16 cw(c7014.29,4568.37) v1@6991.36,4568.37 ; v1@6981.86,4562.87 cw(c6981.86,4549.6) 6991.25,4558.99 cw(c7000.64,4568.37) v1@6987.36,4568.37 ; v1(6981.86,4568.37) 7031.86,4518.37 7031.86,4491.71 6986.02,4445.87 ; v1(6998.52,4433.37) 6986.02,4445.87 ; v1(7620.86,4450.04) 7628.19,4450.04 7632.6,4445.63 v2(7692.52,4445.63) ; v1@7621.92,4451.1 ccw(c7635.13,4464.31) 7635.13,4445.63 ; v1@7624.75,4453.93 ccw(c7644.78,4473.97) 7644.78,4445.63 ; v1@7627.57,4443.32 cw(c7633.14,4437.75) 7633.14,4445.63 ; v1@7627.57,4456.76 ccw(c7654.44,4483.62) 7654.44,4445.63 ; v2@7684.74,4437.85 ccw(c7665.96,4419.07) 7665.96,4445.63 ccw(c7665.96,4472.19) v2@7684.74,4453.41 ; v2@7687.57,4440.68 ccw(c7675.62,4428.73) 7675.62,4445.63 ccw(c7675.62,4462.53) v2@7687.57,4450.58
DB_MEM.BUS_D5: U7.E5 U8.U23 U12.10 U16.14 U61.43 | length 6965.3
  Top Layer w4: U8.U23@5764.02,4044.7 cw(c5764.02,4026.6) 5776.82,4039.4 cw(c5789.62,4052.2) U8.U23@5771.52,4052.2 ; U8.U23@5764.02,4044.86 cw(c5764.02,4027.14) 5776.55,4039.67 cw(c5789.08,4052.2) U8.U23@5771.36,4052.2 ; U8.U23@5764.02,4052.2 v3(5783.7,4032.52) ; U61.43@6351.93,2370.72 6411.18,2370.72 6415.19,2366.71 6442.86,2366.71 6452.19,2376.04 6452.19,2470 6465.19,2483 v1(6465.19,2617.71) ; U61.43@6367.95,2367.89 cw(c6374.78,2361.06) 6374.78,2370.72 cw(c6374.78,2380.37) U61.43@6367.95,2373.54 ; v1@6458.47,2610.99 cw(c6442.26,2594.77) 6465.19,2594.77 cw(c6488.13,2594.77) v1@6471.91,2610.99 ; v1@6461.3,2613.82 cw(c6451.91,2604.43) 6465.19,2604.43 cw(c6478.47,2604.43) v1@6469.08,2613.82 ; v1@6781.86,3957.21 cw(c6781.86,3934.27) 6798.07,3950.49 cw(c6814.29,3966.71) v1@6791.36,3966.71 ; v1@6781.86,3961.21 cw(c6781.86,3947.93) 6791.25,3957.32 cw(c6800.64,3966.71) v1@6787.36,3966.71 ; v1(6781.86,3966.71) 6806.86,3941.71 6806.86,3898.98 6814.86,3890.98 ; U12.10@6820.93,3887.29 ccw(c6814.86,3884.14) 6814.86,3890.98 ; U12.10@6820.93,3894.67 cw(c6814.86,3897.83) 6814.86,3890.98 ; U12.10@6845.59,3890.98 6814.86,3890.98 ; U16.14@6845.59,4561.26 6863.15,4561.26 6875.7,4548.71 ; U16.14@6863.64,4553.27 cw(c6864.6,4537.61) 6875.7,4548.71 ; U16.14@6871.13,4560.77 ccw(c6886.78,4559.8) 6875.7,4548.71 ; v1@6963.47,3948.43 ccw(c6947.26,3964.64) 6970.19,3964.64 ccw(c6993.13,3964.64) v1@6976.91,3948.43 ; v1@6966.3,3945.6 ccw(c6956.91,3954.99) 6970.19,3954.99 ccw(c6983.47,3954.99) v1@6974.08,3945.6 ; v1(6970.19,3941.71) 6970.19,4011.71 6948.52,4033.37 6948.52,4051.37 7023.52,4126.37 7023.52,4257.04 7056.86,4290.37 7056.86,4421.37 7032.19,4446.04 7032.19,4475.37 7040.19,4483.37 7040.19,4533.37 7024.86,4548.71 6875.7,4548.71 ; 5770.9,4045.32 cw(c5758.09,4032.52) 5776.2,4032.52 ccw(c5758.09,4032.52) 5770.9,4045.32 ; 5770.9,4045.32 ccw(c5783.7,4058.13) 5783.7,4040.02 cw(c5783.7,4058.13) 5770.9,4045.32
  Top Layer w8: v2(7810.63,4445.63) U7.E5@7830.32,4465.32 ; v2@7810.63,4454.63 ccw(c7810.63,4476.36) 7825.99,4460.99 ccw(c7841.36,4445.63) v2@7819.63,4445.63 ; U7.E5@7824.32,4465.32 cw(c7809.83,4465.32) 7820.07,4455.07 cw(c7830.32,4444.83) U7.E5@7830.32,4459.32
  MidLayer1 w4: v3(5783.7,4032.52) 5861.38,4032.52 5910,4032.52 5920,4032.52 6002.73,4032.52 6022.75,4012.5 6060,4012.5 6061.37,4013.87 6146.13,4013.87 6179.62,3980.38 6179.62,3928.28 v1(6215.19,3892.71) ; v3@5788.89,4027.33 cw(c5801.43,4014.79) 5801.43,4032.52 cw(c5801.43,4050.25) v3@5788.89,4037.71 ; v1@6205.69,3892.71 ccw(c6182.76,3892.71) 6198.97,3908.93 ccw(c6215.19,3925.14) v1@6215.19,3902.21 ; v1@6209.69,3892.71 ccw(c6196.41,3892.71) 6205.8,3902.1 ccw(c6215.19,3911.49) v1@6215.19,3898.21 ; v1(6465.19,2617.71) 6487.19,2639.71 6487.19,2662.38 6506.86,2682.05 6506.86,2819.69 6515.19,2828.02 6515.19,3155.71 6556.86,3197.37 6556.86,3247.37 6540.19,3264.04 6540.19,3291.71 6606.86,3358.37 6606.86,3994.04 6664.19,4051.37 6697.19,4051.37 v1(6781.86,3966.71) ; v1@6465.19,2623.21 ccw(c6465.19,2636.49) 6474.58,2627.1 ccw(c6483.97,2617.71) v1@6470.69,2617.71 ; v1@6465.19,2627.21 ccw(c6465.19,2650.14) 6481.41,2633.93 ccw(c6497.63,2617.71) v1@6474.69,2617.71 ; v1@6772.36,3966.71 ccw(c6749.42,3966.71) 6765.64,3982.93 ccw(c6781.86,3999.14) v1@6781.86,3976.21 ; v1@6776.36,3966.71 ccw(c6763.08,3966.71) 6772.47,3976.1 ccw(c6781.86,3985.49) v1@6781.86,3972.21 ; v1@7675.14,4171.76 ccw(c7658.92,4187.98) 7681.86,4187.98 ccw(c7704.79,4187.98) v1@7688.57,4171.76 ; v1@7677.97,4168.93 ccw(c7668.58,4178.32) 7681.86,4178.32 ccw(c7695.14,4178.32) v1@7685.75,4168.93 ; v1(7681.86,4165.04) 7681.86,4233.14 7668,4247 7668,4466.54 7683.28,4481.82 7803.18,4481.82 7810.63,4474.37 v2(7810.63,4445.63) ; v2@7802.85,4453.41 ccw(c7784.07,4472.19) 7810.63,4472.19 ccw(c7837.19,4472.19) v2@7818.41,4453.41 ; v2@7805.68,4450.58 ccw(c7793.73,4462.53) 7810.63,4462.53 ccw(c7827.53,4462.53) v2@7815.58,4450.58 ; 5801.81,4032.52 cw(c5801.81,4050.63) 5789,4037.82 ccw(c5801.81,4050.63) 5801.81,4032.52 ; 5801.81,4032.52 ccw(c5801.81,4014.41) 5789,4027.22 cw(c5801.81,4014.41) 5801.81,4032.52
  Bottom Layer w4: v1(6215.19,3892.71) 6215.19,3898.71 6231.86,3915.37 ; v1@6215.19,3902.21 ccw(c6215.19,3910.66) 6221.17,3904.68 ; v1@6216.68,3892.91 cw(c6229.69,3894.64) 6220.41,3903.93 ; v1@6220.64,3893.43 cw(c6239.8,3895.99) 6226.13,3909.65 ; v1@6224.61,3893.96 cw(c6249.9,3897.33) 6231.86,3915.37 ; v1@6775.14,3959.99 ccw(c6758.92,3943.77) 6758.92,3966.71 ccw(c6758.92,3989.64) v1@6775.14,3973.43 ; v1@6777.97,3962.82 ccw(c6768.58,3953.43) 6768.58,3966.71 ccw(c6768.58,3979.99) v1@6777.97,3970.6 ; v1@6785.75,3962.82 cw(c6795.14,3953.43) 6795.14,3966.71 cw(c6795.14,3979.99) v1@6785.75,3970.6 ; v1@6788.57,3959.99 cw(c6804.79,3943.77) 6804.79,3966.71 cw(c6804.79,3989.64) v1@6788.57,3973.43 ; v1@6963.47,3948.43 ccw(c6947.26,3964.64) 6970.19,3964.64 ccw(c6993.13,3964.64) v1@6976.91,3948.43 ; v1@6966.3,3945.6 ccw(c6956.91,3954.99) 6970.19,3954.99 ccw(c6983.47,3954.99) v1@6974.08,3945.6 ; v1(6970.19,3941.71) 6970.19,3990.19 6961.37,3999.01 6929.56,3999.01 6913.52,4015.04 6865.19,3966.71 ; v1@7672.36,4165.04 cw(c7649.42,4165.04) 7665.64,4148.82 cw(c7681.86,4132.61) v1@7681.86,4155.54 ; v1@7676.36,4165.04 cw(c7663.08,4165.04) 7672.47,4155.65 cw(c7681.86,4146.26) v1@7681.86,4159.54 ; v1(7681.86,4165.04) 7633.52,4116.71 7426.51,4116.71 7401.51,4091.71 7206.86,4091.71 7173.52,4058.37 7140.19,4058.37 7131.86,4066.71 7131.86,4083.37 7114.86,4100.37 6993.5,4100.37 6926.82,4033.69 6926.82,4028.34 6865.19,3966.71 ; 6231.86,3915.37 6364.86,3915.37 6416.19,3966.71 v1(6781.86,3966.71) 6865.19,3966.71
DB_MEM.BUS_D6: U7.H6 U8.U24 U12.11 U16.15 U61.45 | length 6808.1
  Top Layer w4: v1@6114.02,3912.71 ccw(c6091.09,3912.71) 6107.31,3928.93 ccw(c6123.52,3945.14) v1@6123.52,3922.21 ; v1@6118.02,3912.71 ccw(c6104.75,3912.71) 6114.14,3922.1 ccw(c6123.52,3931.49) v1@6123.52,3918.21 ; v1(6123.52,3912.71) 6092.5,3943.73 6092.5,3990.73 6091.19,3992.04 6073.52,4009.71 5989,4009.71 5960.88,4009.71 5942.24,4028.34 5940.19,4028.34 5924.74,4028.34 5920,4028.34 5910,4028.34 5843.27,4028.34 ; v1(6298.52,2391.71) 6316.9,2410.09 U61.45@6351.93,2410.09 ; v1@6298.52,2397.21 ccw(c6298.52,2410.49) 6307.91,2401.1 ccw(c6317.3,2391.71) v1@6304.02,2391.71 ; v1@6298.52,2401.21 ccw(c6298.52,2424.14) 6314.74,2407.93 ccw(c6330.96,2391.71) v1@6308.02,2391.71 ; U61.45@6335.91,2407.26 ccw(c6329.08,2400.43) 6329.08,2410.09 ccw(c6329.08,2419.74) U61.45@6335.91,2412.91 ; U12.11@6845.59,3859.49 6900,3859.49 6905.22,3864.71 v1(6954.52,3864.71) v1@6948.19,3858.37 ; U16.15@6845.59,4529.76 6848.52,4529.76 6858.8,4540.04 7022.21,4540.04 7032.19,4530.06 7032.19,4486.69 7024.19,4478.69 7024.19,4425.71 v1(7037.86,4412.04) ; U16.15@6854.66,4538.25 cw(c6858.99,4533.92) 6858.99,4540.04 ; U16.15@6857.49,4535.42 cw(c6868.65,4524.27) 6868.65,4540.04 ; U16.15@6860.32,4532.59 cw(c6878.3,4514.61) 6878.3,4540.04 ; U16.15@6863.15,4529.76 cw(c6887.96,4504.95) 6887.96,4540.04 ; U16.15@6865.98,4526.94 cw(c6897.62,4495.3) 6897.62,4540.04 ; U12.11@6868.81,3853.83 cw(c6882.46,3840.18) 6882.46,3859.49 cw(c6882.46,3878.8) U12.11@6868.81,3865.15 ; U16.15@6868.81,4524.11 cw(c6907.27,4485.64) 6907.27,4540.04 ; v1@6947.81,3857.99 ccw(c6931.59,3841.77) 6931.59,3864.71 ccw(c6931.59,3887.64) v1@6947.81,3871.43 ; v1@6950.64,3860.82 ccw(c6941.25,3851.43) 6941.25,3864.71 ccw(c6941.25,3877.99) v1@6950.64,3868.6 ; 5815.92,4039.67 ccw(c5843.27,4067.02) 5843.27,4028.34 ; 5815.92,4039.67 ccw(c5843.27,4067.02) 5843.27,4028.34 ; 5815.92,4039.67 cw(c5828.45,4052.2) 5810.73,4052.2 ccw(c5828.45,4052.2) 5815.92,4039.67 ; 5815.92,4039.67 ccw(c5803.39,4027.14) 5803.39,4044.86 cw(c5803.39,4027.14) 5815.92,4039.67
  Top Layer w8: v2(7692.52,4406.26) U7.H6@7712.2,4425.94 ; v2@7692.52,4415.26 ccw(c7692.52,4436.99) 7707.88,4421.62 ccw(c7723.25,4406.26) v2@7701.52,4406.26 ; U7.H6@7706.2,4425.94 cw(c7691.72,4425.94) 7701.96,4415.7 cw(c7712.2,4405.46) U7.H6@7712.2,4419.94
  MidLayer1 w4: v1@6298.52,2382.21 cw(c6298.52,2359.27) 6314.74,2375.49 cw(c6330.96,2391.71) v1@6308.02,2391.71 ; v1@6298.52,2386.21 cw(c6298.52,2372.93) 6307.91,2382.32 cw(c6317.3,2391.71) v1@6304.02,2391.71 ; v1(6298.52,2391.71) 6340.19,2350.04 6497.19,2350.04 6537.19,2390.04 6537.19,2472.04 6733.86,2668.71 6733.86,2760.37 7131.86,3158.37 7131.86,3488.04 v1(7223.52,3579.71) ; v1(6954.52,3864.71) 6954.52,3871.71 7049.52,3966.71 v1(7049.52,4158.04) 7073.52,4182.04 7073.52,4368.04 7029.52,4412.04 v1(7037.86,4412.04) ; v1@7039.36,4412.04 ccw(c7063.1,4412.04) 7046.31,4395.25 ; v1@7042.81,4151.32 cw(c7026.59,4135.11) 7049.52,4135.11 cw(c7072.46,4135.11) v1@7056.24,4151.32 ; v1@7043.36,4412.04 ccw(c7076.75,4412.04) 7053.14,4388.43 ; v1@7045.64,4154.15 cw(c7036.25,4144.76) 7049.52,4144.76 cw(c7062.8,4144.76) v1@7053.41,4154.15 ; v1@7047.36,4412.04 ccw(c7090.41,4412.04) 7059.97,4381.6 ; v1@7049.52,4163.54 ccw(c7049.52,4176.82) 7058.91,4167.43 ccw(c7068.3,4158.04) v1@7055.02,4158.04 ; v1@7049.52,4167.54 ccw(c7049.52,4190.48) 7065.74,4174.26 ccw(c7081.96,4158.04) v1@7059.02,4158.04 ; v1@7214.02,3579.71 cw(c7191.09,3579.71) 7207.31,3563.49 cw(c7223.52,3547.27) v1@7223.52,3570.21 ; v1@7218.02,3579.71 cw(c7204.75,3579.71) 7214.14,3570.32 cw(c7223.52,3560.93) v1@7223.52,3574.21
  MidLayer2 w4: v1@6948.34,3857.5 cw(c6936.8,3844.04) 6954.52,3844.04 ; v1@6950.94,3860.53 cw(c6944.26,3852.74) 6954.52,3852.74 cw(c6964.79,3852.74) v1@6958.11,3860.53 ; v1(6954.52,3864.71) 6954.52,3844.04 ; v1@6960.71,3857.5 ccw(c6972.25,3844.04) 6954.52,3844.04 ; v1@7047.76,4159.81 cw(c7064.41,4143.15) 7064.41,4166.71 ; v1(7049.52,4158.04) 7058.19,4166.71 7306.86,4166.71 7431.86,4291.71 7541.52,4291.71 7656.08,4406.26 v2(7692.52,4406.26) ; v1@7050.58,4156.98 cw(c7074.07,4133.5) 7074.07,4166.71 ; v1@7053.41,4154.15 cw(c7083.73,4123.84) 7083.73,4166.71 ; v1@7056.24,4151.32 cw(c7093.38,4114.18) 7093.38,4166.71 ; v1(7223.52,3579.71) 7256.86,3613.04 7256.86,3741.71 7215.19,3783.37 7015.19,3783.37 6954.52,3844.04 ; v1@7223.52,3585.21 ccw(c7223.52,3598.49) 7232.91,3589.1 ccw(c7242.3,3579.71) v1@7229.02,3579.71 ; v1@7223.52,3589.21 ccw(c7223.52,3612.14) 7239.74,3595.93 ccw(c7255.96,3579.71) v1@7233.02,3579.71 ; v2@7684.74,4398.48 ccw(c7665.96,4379.7) 7665.96,4406.26 ccw(c7665.96,4432.82) v2@7684.74,4414.04 ; v2@7687.57,4401.31 ccw(c7675.62,4389.36) 7675.62,4406.26 ccw(c7675.62,4423.16) v2@7687.57,4411.21
  Bottom Layer w4: v1@6123.52,3903.21 cw(c6123.52,3880.27) 6139.74,3896.49 cw(c6155.96,3912.71) v1@6133.02,3912.71 ; v1@6123.52,3907.21 cw(c6123.52,3893.93) 6132.91,3903.32 cw(c6142.3,3912.71) v1@6129.02,3912.71 ; v1(6123.52,3912.71) 6156.86,3879.37 6156.86,3800.04 6190.19,3766.71 6248.52,3766.71 6262.21,3766.71 6300.5,3805 6303.88,3808.37 6398.52,3808.37 6448.52,3758.37 6499.86,3758.37 6558.19,3816.71 6780.52,3816.71 6781.86,3818.04 6849.86,3818.04 6896.52,3864.71 v1(6954.52,3864.71) ; v1@6947.81,3857.99 ccw(c6931.59,3841.77) 6931.59,3864.71 ccw(c6931.59,3887.64) v1@6947.81,3871.43 ; v1@6950.64,3860.82 ccw(c6941.25,3851.43) 6941.25,3864.71 ccw(c6941.25,3877.99) v1@6950.64,3868.6
DB_MEM.BUS_D7: U7.E6 U8.G24 U12.13 U16.16 U61.46 | length 7046.9
  Top Layer w4: v1@6069.14,4893.32 cw(c6058.55,4882.74) 6073.52,4882.74 ; 6073.52,4871.47 cw(c6104.42,4871.47) v1@6082.57,4893.32 ; 6073.52,4881.13 cw(c6094.77,4881.13) v1@6079.75,4896.15 ; v1(6075.86,4900.04) 6073.52,4897.71 6073.52,4836.37 6136.52,4773.37 6136.52,4746.37 6098.52,4708.37 6098.52,4675.04 6106.86,4666.71 6106.86,4633.37 6136.86,4603.37 6136.86,4525.04 6086.86,4475.04 6058.19,4475.04 6041.52,4458.37 5948.92,4458.37 5937.52,4469.77 5924.74,4469.77 5920,4469.77 5910,4469.77 5843.27,4469.77 ; U61.46@6351.93,2429.77 6378.52,2429.77 6383.25,2425.04 v1(6390.19,2425.04) ; U61.46@6355.84,2429.77 cw(c6355.84,2390.69) v1@6383.47,2418.32 ; U61.46@6365.49,2429.77 cw(c6365.49,2400.34) v1@6386.3,2421.15 ; U61.46@6367.95,2426.94 cw(c6374.78,2420.11) 6374.78,2429.77 cw(c6374.78,2439.43) U61.46@6367.95,2432.6 ; 6375.15,2429.77 cw(c6375.15,2410) v1@6389.13,2423.98 ; 6378.67,2429.77 ccw(c6378.67,2436.56) v1@6383.47,2431.76 ; U12.13@6845.59,3796.5 6919.74,3796.5 v1(6931.86,3784.37) 6973.52,3826.04 6973.52,3908.37 6948.52,3933.37 6948.52,4008.37 6940.19,4016.71 6940.19,4055.04 7005,4119.85 7005,4180 6985,4200 6985,4235 7031.86,4281.86 7031.86,4383.37 7016.19,4399.04 7016.19,4460 7006.86,4469.33 ; U16.16@6845.59,4498.27 6970,4498.27 6976.56,4491.71 v1(7006.86,4491.71) 7006.86,4469.33 ; U12.13@6868.81,3790.84 cw(c6882.46,3777.18) 6882.46,3796.5 cw(c6882.46,3815.81) U12.13@6868.81,3802.15 ; U16.16@6868.81,4492.61 cw(c6882.46,4478.95) 6882.46,4498.27 cw(c6882.46,4517.58) U16.16@6868.81,4503.92 ; v1@6931.86,3789.87 ccw(c6931.86,3803.15) 6941.25,3793.76 ccw(c6950.64,3784.37) v1@6937.36,3784.37 ; v1@6931.86,3793.87 ccw(c6931.86,3816.81) 6948.07,3800.59 ccw(c6964.29,3784.37) v1@6941.36,3784.37 ; v1@7000.14,4484.99 ccw(c6983.92,4468.77) 6983.92,4491.71 ccw(c6983.92,4514.64) v1@7000.14,4498.43 ; v1@7000.26,4484.87 cw(c6985.26,4469.33) 7006.86,4469.33 ; v1@7002.97,4487.82 ccw(c6993.58,4478.43) 6993.58,4491.71 ccw(c6993.58,4504.99) v1@7002.97,4495.6 ; v1@7003.04,4487.75 cw(c6994.35,4478.75) 7006.86,4478.75 cw(c7019.36,4478.75) v1@7010.68,4487.75 ; v1@7013.45,4484.87 ccw(c7028.45,4469.33) 7006.86,4469.33 ; 5815.92,4458.44 cw(c5843.27,4431.09) 5843.27,4469.77 ; 5815.92,4458.44 cw(c5843.27,4431.09) 5843.27,4469.77 ; 5815.92,4458.44 cw(c5803.39,4470.97) 5803.39,4453.25 ccw(c5803.39,4470.97) 5815.92,4458.44 ; 5815.92,4458.44 ccw(c5828.45,4445.91) 5810.73,4445.91 cw(c5828.45,4445.91) 5815.92,4458.44
  Top Layer w8: v2(7810.63,4406.26) U7.E6@7830.32,4425.94 ; v2@7810.63,4415.26 ccw(c7810.63,4436.99) 7825.99,4421.62 ccw(c7841.36,4406.26) v2@7819.63,4406.26 ; U7.E6@7824.32,4425.94 cw(c7809.83,4425.94) 7820.07,4415.7 cw(c7830.32,4405.46) U7.E6@7830.32,4419.94
  MidLayer1 w4: v1(6075.86,4900.04) 6681.86,4900.04 6732.19,4950.37 6867.94,4950.37 6940.19,4878.12 6940.19,4829.81 v1(6945,4825) ; v1@6079.75,4896.15 cw(c6089.14,4886.76) 6089.14,4900.04 cw(c6089.14,4913.32) v1@6079.75,4903.93 ; v1@6082.57,4893.32 cw(c6098.79,4877.11) 6098.79,4900.04 cw(c6098.79,4922.98) v1@6082.57,4906.76 ; v1@6380.69,2425.04 ccw(c6357.76,2425.04) 6373.97,2441.26 ccw(c6390.19,2457.48) v1@6390.19,2434.54 ; v1@6384.69,2425.04 ccw(c6371.41,2425.04) 6380.8,2434.43 ccw(c6390.19,2443.82) v1@6390.19,2430.54 ; v1(6390.19,2425.04) 6365.19,2450.04 6365.19,2553.37 6379.52,2567.71 6482.86,2567.71 6623.52,2708.37 6623.52,2858.37 6706.86,2941.71 6706.86,3384.37 6699.52,3391.71 6699.52,3442.71 6723.52,3466.71 6723.52,3483.37 6698.52,3508.37 6679.52,3508.37 6656.86,3531.04 6656.86,3627.71 6665.19,3636.04 6715.19,3636.04 6759.52,3591.71 6806.86,3591.71 6823.52,3608.37 6823.52,3645.04 6931.86,3753.37 v1(6931.86,3784.37) ; v1@6925.14,3777.66 cw(c6908.92,3761.44) 6931.86,3761.44 cw(c6954.79,3761.44) v1@6938.57,3777.66 ; v1@6927.97,3780.49 cw(c6918.58,3771.1) 6931.86,3771.1 cw(c6945.14,3771.1) v1@6935.75,3780.49 ; v1@6938.28,4831.72 ccw(c6933.68,4836.32) 6940.19,4836.32 ; 6940.19,4840.23 ccw(c6960.23,4840.23) v1@6946.06,4826.06 ; 6940.19,4849.89 ccw(c6969.89,4849.89) v1@6948.89,4828.89 ; 6940.19,4859.55 ccw(c6979.55,4859.55) v1@6951.72,4831.72
  MidLayer2 w4: v1(7006.86,4491.71) 7056.86,4491.71 7098.52,4450.04 7107.19,4441.37 7258.15,4441.37 7266.78,4450 7266.82,4450.04 7284.48,4467.71 7298.52,4467.71 7822.52,4467.71 7831.86,4458.37 7831.86,4425.04 ; v1@7010.75,4487.82 cw(c7020.14,4478.43) 7020.14,4491.71 cw(c7020.14,4504.99) v1@7010.75,4495.6 ; v1@7013.57,4484.99 cw(c7029.79,4468.77) 7029.79,4491.71 cw(c7029.79,4514.64) v1@7013.57,4498.43 ; v2(7810.63,4406.26) 7810.63,4408.37 7815.19,4408.37 7831.86,4425.04 ; v2@7811.05,4413.25 ccw(c7812.19,4432.13) 7825.57,4418.75 ; v2@7811.29,4417.24 ccw(c7812.91,4443.99) 7831.86,4425.04 ; v2@7821.63,4406.26 cw(c7842.28,4406.26) 7827.68,4420.86
  Bottom Layer w4: v1@6938.28,4818.28 cw(c6922.06,4802.06) 6945,4802.06 cw(c6967.93,4802.06) v1@6951.72,4818.28 ; v1@6941.11,4821.11 cw(c6931.72,4811.72) 6945,4811.72 cw(c6958.28,4811.72) v1@6948.89,4821.11 ; v1(6945,4825) 6945,4771.23 6966.02,4750.21 6966.02,4716.54 6956.52,4707.04 6956.52,4542.04 v1(7006.86,4491.71) ; v1@6997.36,4491.71 ccw(c6974.42,4491.71) 6990.64,4507.93 ccw(c7006.86,4524.14) v1@7006.86,4501.21 ; v1@7001.36,4491.71 ccw(c6988.08,4491.71) 6997.47,4501.1 ccw(c7006.86,4510.49) v1@7006.86,4497.21